# Altium PCB ELF 2 & ELF 2_Lite V1.3.PcbDoc (part 6 of 8)
Units mm, origin at the board's own origin, x right, y up, seen from the top; angles counter-clockwise.
Board outline 120 x 75 mm, 4 copper layers (01 TOP, 02 GND, 03 Signal, 04 BOT), stack 0.603 mm thick; 470 components, 412 nets, 2075 pads, 1565 vias.
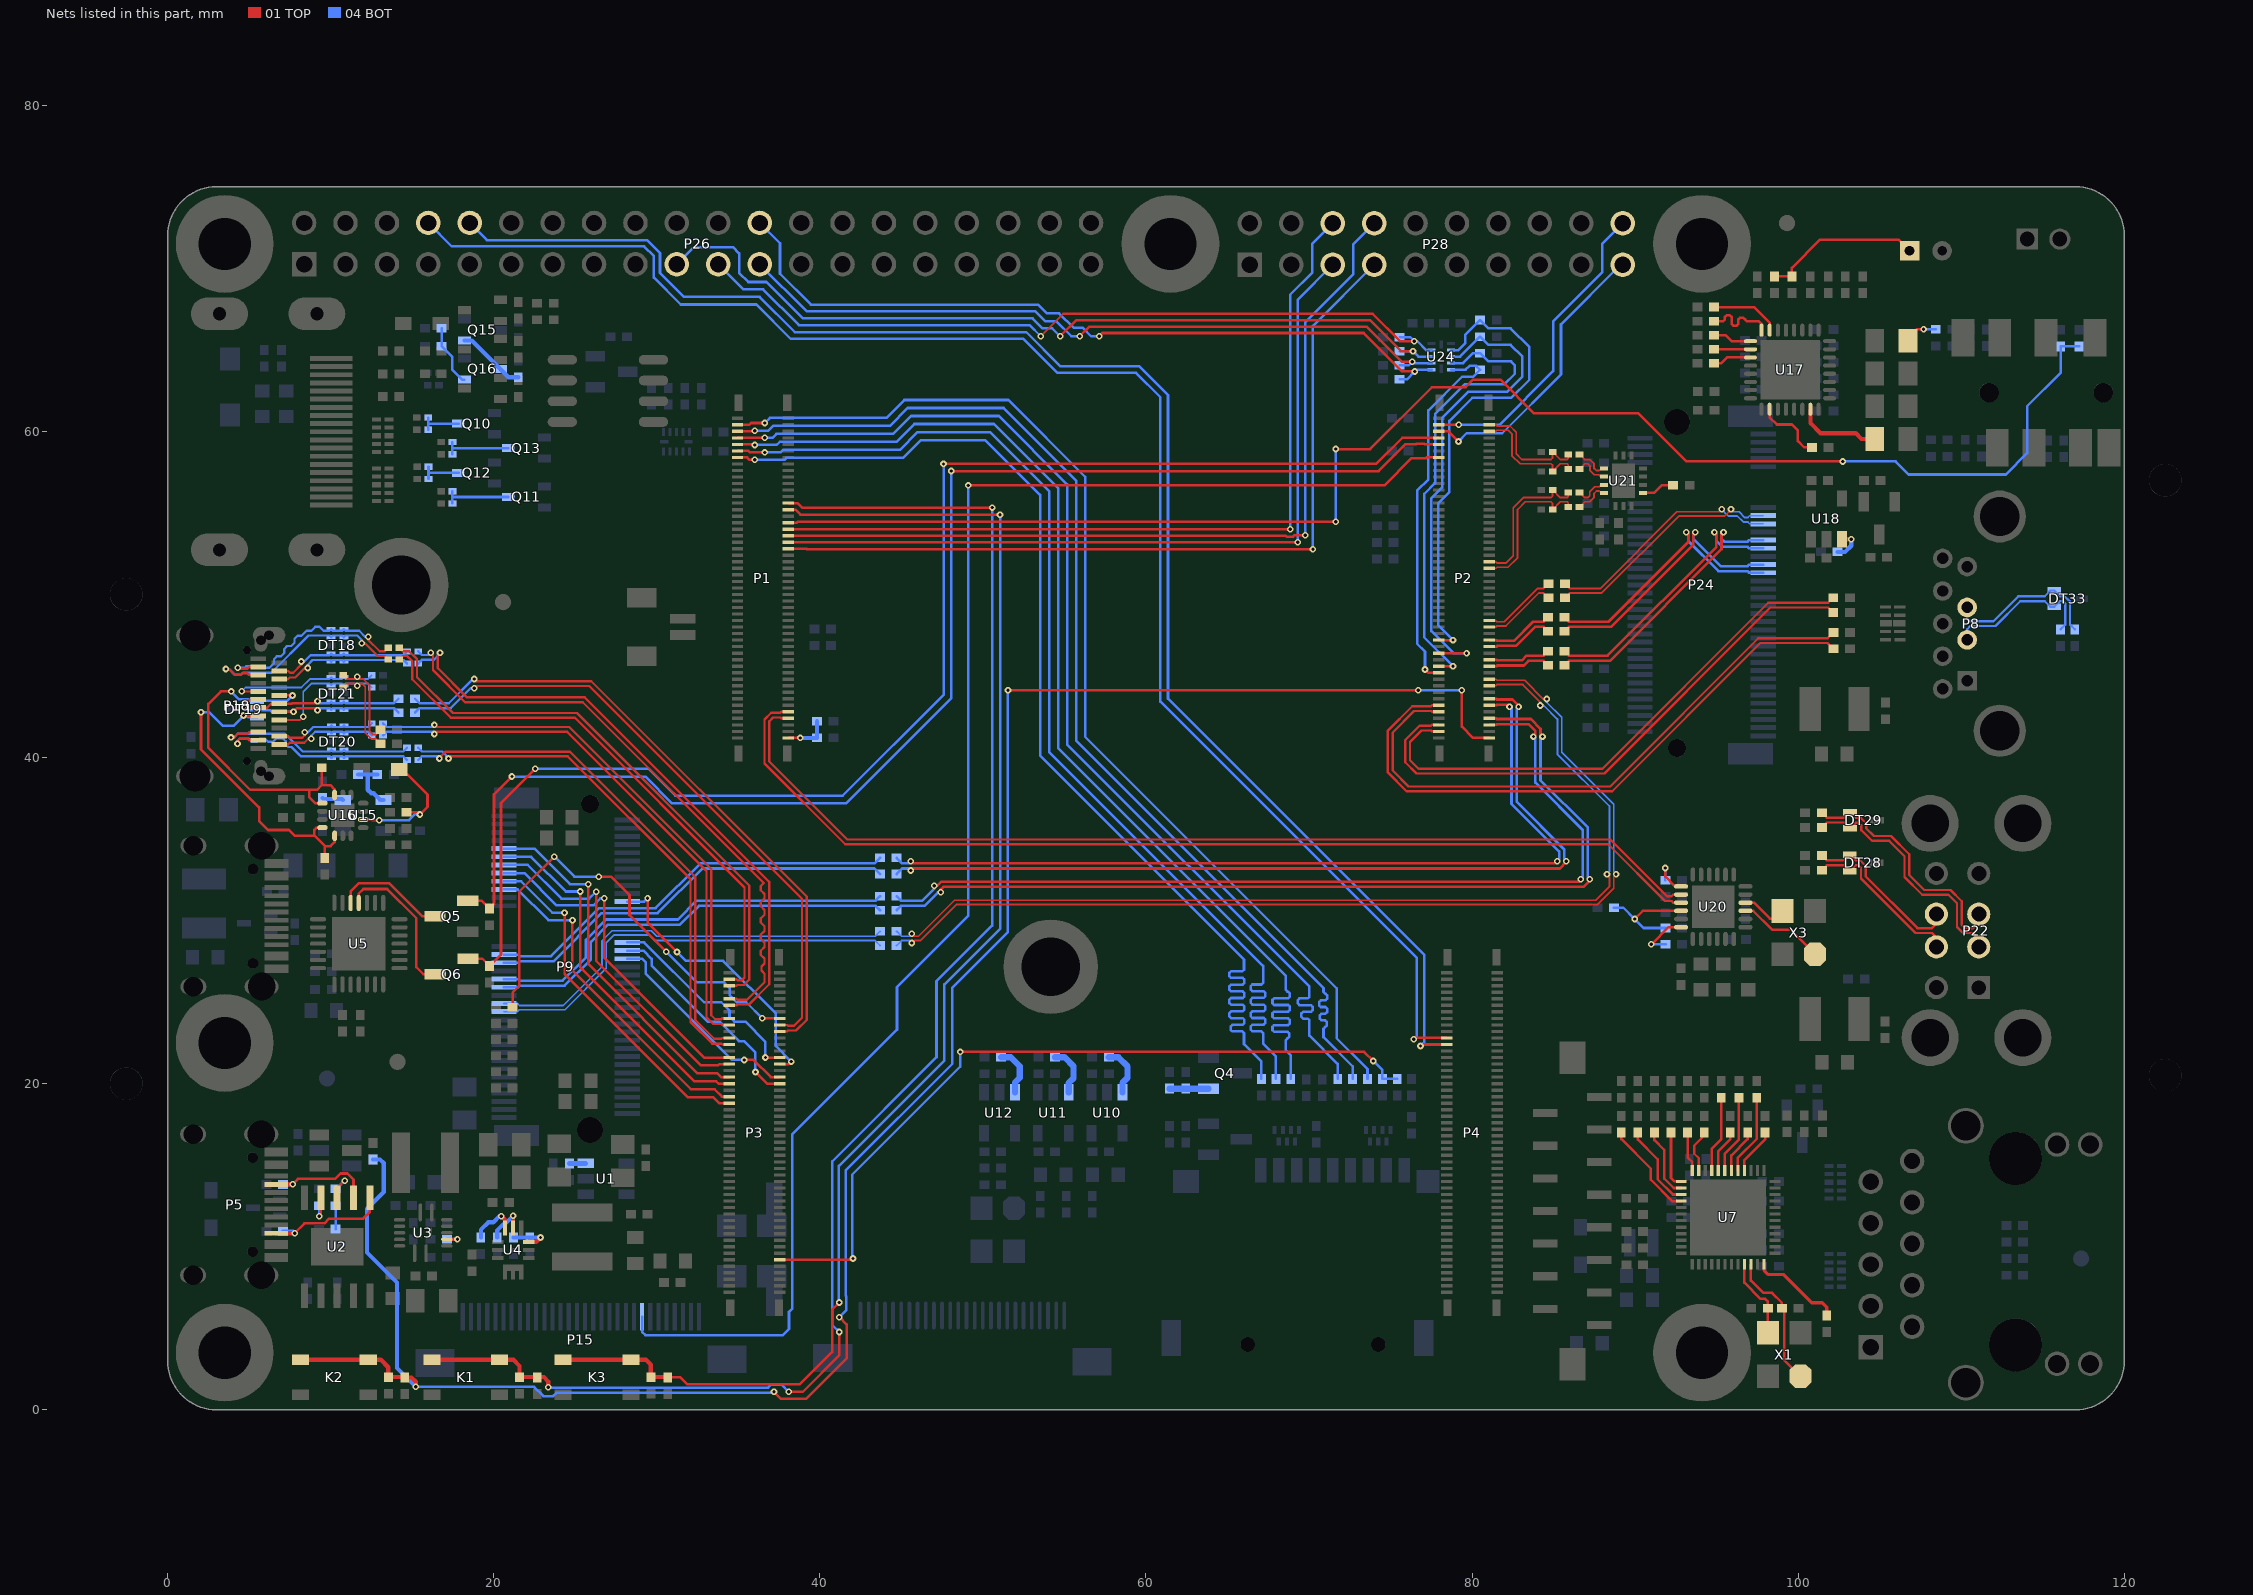
[diagram p7: the nets of this part, all layers, seen from the top]

## Via types
v1: diameter 0.406, hole 0.203, 01 TOP to 04 BOT, tented both sides, 1349 vias
v2: diameter 0.508, hole 0.305, 01 TOP to 04 BOT, tented both sides, 173 vias
v3: diameter 0.6, hole 0.3, 01 TOP to 04 BOT, tented both sides, 34 vias
v4: diameter 0.6, hole 0.3, 01 TOP to 04 BOT, 9 vias

## Nets (pads, with @x,y where several pads share a name; then routed paths per layer and width w, separated by ;. In a path a pad name is that pad's centre, name@x,y a point inside that pad or via, vN(x,y) a via of type N, cw(c..) or ccw(c..) an arc to the next point about the centre after c; other vN are vias at no path point) (continued)
NetQ4_1: Q4.1 R36.2 R37.2 | length 2.4
  04 BOT w0.381: R36.2@61.441,19.692 R37.2@62.441,19.692 63.833,19.692 Q4.1@63.841,19.684
NetQ10_3: Q10.3 R86.2 R87.2 | length 2.6
  04 BOT w0.156: R87.2@15.974,60.096 15.974,60.471 ; R86.2@15.974,60.846 15.974,60.471 ; Q10.3@17.851,60.476 15.979,60.476 15.974,60.471
NetQ11_3: Q11.3 R88.2 R89.2 | length 4.2
  04 BOT w0.156: R89.2@17.469,55.583 17.469,55.958 ; R88.2@17.469,56.333 17.469,55.958 ; Q11.3@20.901,55.976 17.487,55.976 17.469,55.958
NetQ12_3: Q12.3 R90.2 R91.2 | length 2.6
  04 BOT w0.156: R91.2@15.999,57.083 15.999,57.458 ; R90.2@15.999,57.833 15.999,57.458 ; Q12.3@17.851,57.451 16.006,57.451 15.999,57.458
NetQ13_3: Q13.3 R92.2 R93.2 | length 4.2
  04 BOT w0.156: R93.2@17.469,58.596 17.469,58.971 ; R92.2@17.469,59.346 17.469,58.971 ; Q13.3@20.901,58.976 17.474,58.976 17.469,58.971
NetQ15_1: Q15.1 Q16.3 R97.2 | length 4.2
  04 BOT w0.254: Q15.1@18.201,65.576 18.651,65.576 Q16.3@20.401,63.826 20.909,63.318 R97.2@21.501,63.318
NetQ16_1: Q16.1 R98.1 R99.1 | length 3.8
  04 BOT w0.156: R99.1@16.809,66.326 R98.1@16.809,65.226 17.452,64.583 17.452,63.782 18.058,63.176 Q16.1@18.201,63.176
NetR15_2: R15.2 U1.3 | length 1
  04 BOT w0.305: R15.2@24.657,15.112 U1.3@25.641,15.112
NetR17_1: R17.1 U2.9 | length 1.8
  01 TOP w0.156: v1(9.291,11.871) 9.4,11.979 U2.9@9.4,13
  04 BOT w0.156: v1(9.291,11.871) R17.1@9.291,12.506
NetR17_2: R17.2 R18.1 | length 1.4
  04 BOT w0.156: R18.1@10.307,11.083 R17.2@10.307,12.506
NetR19_1: R19.1 U2.8 | length 2
  01 TOP w0.156: U2.8@10.4,13 10.4,13.594 v1(10.856,14.05)
  04 BOT w0.156: R19.1@10.307,13.547 10.353,13.547 v1(10.856,14.05)
NetR26_1: R26.1 U3.4 | length 1.3
  01 TOP w0.198: U3.4@17.125,10.45 v1(17.773,10.45)
  04 BOT w0.198: R26.1@17.14,10.448 v1@17.771,10.448
NetR29_2: R29.2 R32.1 U4.3 | length 2.5
  01 TOP w0.254: U4.3@22.135,10.3 22.605,10.3 v1(22.868,10.563)
  04 BOT w0.254: R32.1@21.212,10.563 R29.2@22.212,10.563 v1(22.868,10.563)
NetR30_2: R30.2 U4.5 | length 2.5
  01 TOP w0.254: U4.5@21.185,11.15 v1(21.185,11.889)
  04 BOT w0.254: R30.2@20.212,10.563 20.212,10.997 20.573,11.358 20.654,11.358 v1(21.185,11.889)
NetR31_2: R31.2 U4.6 | length 2.9
  01 TOP w0.254: v1(20.467,11.871) 20.685,11.653 U4.6@20.685,11.15
  04 BOT w0.254: R31.2@19.212,10.563 19.212,11.043 19.665,11.495 19.971,11.495 20.347,11.871 v1(20.467,11.871)
NetR49_2: R49.2 U7.16 | length 2.8
  01 TOP w0.156: U7.16@96.7,14.675 96.7,15.313 97.963,16.575 R49.2@97.963,17.001
NetR50_2: R50.2 U7.17 | length 4.9
  01 TOP w0.156: U7.17@96.3,14.675 96.3,15.463 97.455,16.618 R50.2@97.455,19.135
NetR51_2: R51.2 U7.18 | length 2.7
  01 TOP w0.156: U7.18@95.9,14.675 95.9,15.603 96.896,16.599 R51.2@96.896,17.001
NetR53_2: R53.2 U7.19 | length 4.8
  01 TOP w0.156: U7.19@95.5,14.675 95.5,15.709 96.362,16.572 R53.2@96.362,19.135
NetR55_2: R55.2 U7.20 | length 2.6
  01 TOP w0.156: U7.20@95.1,14.675 95.1,15.858 95.821,16.579 R55.2@95.821,17.001
NetR57_2: R57.2 U7.21 | length 4.7
  01 TOP w0.156: U7.21@94.7,14.675 94.7,16.012 95.27,16.582 R57.2@95.27,19.135
NetR58_2: R58.2 U7.23 | length 2.7
  01 TOP w0.156: U7.23@93.9,14.675 93.9,15.423 93.623,15.701 93.623,16.198 94.229,16.805 R58.2@94.229,17.001
NetR59_2: R59.2 U7.24 | length 2.4
  01 TOP w0.156: R59.2@93.213,17.001 93.213,15.483 93.5,15.195 U7.24@93.5,14.675
NetR60_2: R60.2 U7.25 | length 3.5
  01 TOP w0.156: R60.2@92.197,17.001 92.197,14.218 92.415,14 U7.25@92.824,14
NetR61_2: R61.2 U7.26 | length 4.4
  01 TOP w0.156: R61.2@91.181,17.001 91.181,16.544 91.783,15.942 91.783,14.183 92.366,13.6 U7.26@92.824,13.6
NetR63_2: R63.2 U7.27 | length 5.2
  01 TOP w0.156: R63.2@90.165,17.001 90.165,16.57 91.385,15.35 91.385,14.131 92.316,13.2 U7.27@92.824,13.2
NetR64_2: R64.2 U7.28 | length 6
  01 TOP w0.156: R64.2@89.149,17.001 89.149,16.595 90.965,14.779 90.965,14.106 92.271,12.8 U7.28@92.824,12.8
NetR73_2: R73.2 U7.48 | length 5.7
  01 TOP w0.203: U7.48@97.9,8.925 97.9,8.536 98.139,8.297 99.077,8.297 100.816,6.558 101.472,6.558 101.747,6.283 R73.2@101.747,5.775
NetR78_2: R78.2 U10.3 | length 3.1
  04 BOT w0.381: R78.2@57.717,21.613 58.31,21.613 58.865,21.059 58.865,20.352 58.559,20.047 U10.3@58.559,19.463
NetR79_2: R79.2 U11.3 | length 3.1
  04 BOT w0.381: R79.2@54.417,21.613 55.01,21.613 55.553,21.071 55.553,20.336 55.259,20.042 U11.3@55.259,19.463
NetR80_2: R80.2 U12.3 | length 3.1
  04 BOT w0.381: R80.2@51.117,21.613 51.71,21.613 52.253,21.071 52.253,20.36 51.959,20.066 U12.3@51.959,19.463
NetR101_2: R101.2 R103.2 U15.4 | length 3.3
  04 BOT w0.254: R101.2@11.689,38.963 12.273,38.963 ; R103.2@12.861,38.959 R103.2@12.857,38.963 12.273,38.963 ; U15.4@13.244,37.4 13.044,37.4 12.638,37.805 12.491,37.805 12.273,38.023 12.273,38.963
NetR102_1: R102.1 U15.3 | length 1.3
  04 BOT w0.254: R102.1@9.494,37.517 9.553,37.458 10.686,37.458 U15.3@10.744,37.4
NetR116_2: R116.2 U17.11 | length 2.4
  01 TOP w0.156: R116.2@94.838,64.169 95.273,64.169 95.637,64.532 U17.11@97.072,64.532
NetR117_2: R117.2 U17.8 | length 4.6
  01 TOP w0.156: R117.2@94.838,66.76 95.321,66.76 95.399,66.76 95.502,66.863 95.502,67.013 95.604,67.116 95.81,67.116 95.912,67.013 95.912,66.585 96.015,66.482 96.22,66.482 96.323,66.585 96.323,66.863 96.425,66.965 96.631,66.965 96.733,66.863 96.836,66.76 97.384,66.76 97.574,66.76 97.747,66.588 U17.8@97.747,66.207
NetR118_2: R118.2 U17.7 | length 4.3
  01 TOP w0.156: R118.2@94.838,67.624 97.292,67.624 98.247,66.669 U17.7@98.247,66.207
NetR119_2: R119.2 U17.10 | length 2.2
  01 TOP w0.156: R119.2@94.838,65.033 U17.10@97.072,65.032
NetR120_2: R120.2 U17.9 | length 2.4
  01 TOP w0.156: R120.2@94.838,65.896 95.194,65.896 95.55,65.896 95.914,65.532 U17.9@97.072,65.532
NetR121_2: R121.2 U17.18 | length 4.2
  01 TOP w0.156: U17.18@98.247,61.357 98.247,60.864 98.688,60.423 99.614,60.423 99.982,60.054 99.982,59.397 100.366,59.013 R121.2@100.833,59.013
NetR125_2: R125.2 U18.3 | length 2
  01 TOP w0.254: U18.3@102.68,53.38 U18.3@102.678,53.382 v1(103.25,53.382)
  04 BOT w0.254: R125.2@102.4,52.609 102.874,52.609 103.25,52.984 v1(103.25,53.382)
NetR140_2: R140.2 U20.18 | length 3.1
  01 TOP w0.156: v1(90.992,28.544) 92.042,29.594 U20.18@92.813,29.594
  04 BOT w0.156: v1(90.992,28.544) R140.2@91.868,28.544
NetR142_2: R142.2 R157.1 U20.16 | length 6.7
  01 TOP w0.156: v1(89.967,30.099) 90.462,30.594 U20.16@92.813,30.594
  04 BOT w0.156: R157.1@88.697,30.785 89.281,30.785 v1(89.967,30.099) 90.521,29.544 R142.2@91.868,29.544
NetR145_1: R145.1 U20.13 | length 2.5
  01 TOP w0.156: v1(91.848,33.224) 91.848,32.699 92.452,32.094 U20.13@92.813,32.094
  04 BOT w0.156: R145.1@91.848,32.476 v1(91.848,33.224)
NetR167_2: R167.2 U21.1 | length 2
  01 TOP w0.156: U21.1@90.481,56.222 91.147,56.222 91.618,56.693 R167.2@92.329,56.693
NetU20_3: U20.3 X3.1 | length 5.4
  01 TOP w0.156: U20.3@96.763,30.594 97.24,30.594 98.395,29.44 99.52,29.44 X3.1@101.023,27.937
NetU20_4: U20.4 X3.3 | length 2.9
  01 TOP w0.156: U20.4@96.763,31.094 97.277,31.094 98.257,30.115 98.551,30.115 X3.3@99.023,30.587
PCIE0_REFCLK_N: P2.64 R154.2 | length 4.6
  01 TOP w0.109: P2.64@81.05,48.4 81.446,48.4 81.515,48.331 81.967,48.331 83.992,50.355 84.377,50.355 R154.2@84.678,50.656
PCIE0_REFCLK_P: P2.66 R153.2 | length 4.6
  01 TOP w0.109: P2.66@81.05,48 81.446,48 81.515,48.069 82.076,48.069 84.1,50.094 84.377,50.094 R153.2@84.678,49.793
PCIE0_RX_N: P2.70 R160.2 | length 4.2
  01 TOP w0.163: P2.70@81.05,47.2 81.497,47.2 81.539,47.157 82.563,47.157 83.73,48.325 84.379,48.325 R160.2@84.653,48.599
PCIE0_RX_P: P2.72 R159.2 | length 4.2
  01 TOP w0.163: P2.72@81.05,46.8 81.497,46.8 81.539,46.843 82.693,46.843 83.861,48.01 84.379,48.01 R159.2@84.653,47.735
PCIE0_TX_N: P2.76 R158.2 | length 3.9
  01 TOP w0.163: P2.76@81.05,46 81.497,46 81.539,45.957 81.632,45.957 83.045,45.957 83.33,46.242 84.379,46.242 R158.2@84.653,46.516
PCIE0_TX_P: P2.78 R156.2 | length 3.9
  01 TOP w0.163: P2.78@81.05,45.6 81.497,45.6 81.539,45.643 83.176,45.643 83.46,45.927 84.379,45.927 R156.2@84.653,45.653
PCIE2_CLK_N: P9.49 R161.1 | length 26.2
  04 BOT w0.109: P9.49@20.629,24.411 21.454,24.411 21.573,24.531 24.367,24.531 26.902,27.066 26.902,28.648 27.363,29.108 29.543,29.108 29.877,28.774 43.387,28.774 R161.1@43.688,28.473
PCIE2_CLK_P: P9.47 R162.1 | length 26.2
  04 BOT w0.109: P9.47@20.629,24.911 21.46,24.911 21.579,24.792 24.259,24.792 26.641,27.174 26.641,28.756 27.254,29.37 29.652,29.37 29.986,29.036 43.387,29.036 R162.1@43.688,29.337
PCIE2_RX_N: P9.43 R163.1 | length 25.9
  04 BOT w0.163: P9.43@20.629,25.911 21.489,25.911 21.582,26.004 24.351,26.004 25.958,27.611 25.958,28.692 27.015,29.749 31.416,29.749 32.573,30.907 43.414,30.907 R163.1@43.688,30.632
PCIE2_RX_P: P9.41 R164.1 | length 25.9
  04 BOT w0.163: P9.41@20.629,26.411 21.484,26.411 21.576,26.319 24.22,26.319 25.643,27.742 25.643,28.822 26.885,30.064 31.285,30.064 32.443,31.222 43.414,31.222 R164.1@43.688,31.496
PCIE2_TX_N: C134.1 P9.37 | length 25.6
  04 BOT w0.163: P9.37@20.629,27.411 21.489,27.411 21.582,27.504 23.653,27.504 26.599,30.45 30.054,30.45 32.797,33.193 43.35,33.193 C134.1@43.688,32.855
PCIE2_TX_P: C140.1 P9.35 | length 25.6
  04 BOT w0.163: P9.35@20.629,27.911 21.484,27.911 21.576,27.819 23.522,27.819 26.468,30.765 29.924,30.765 32.666,33.508 43.35,33.508 C140.1@43.688,33.845
PCIE20_0_REFCLK_N: P2.82 R161.2 | length 63
  01 TOP w0.109: v1(45.644,28.626) 45.792,28.774 46.159,28.774 48.365,30.98 87.685,30.98 88.679,31.974 88.679,32.694 v1(88.828,32.842) ; P2.82@81.05,44.8 81.461,44.8 81.53,44.731 83.223,44.731 84.37,43.584 v1(84.58,43.584)
  04 BOT w0.109: R161.2@44.704,28.473 45.005,28.774 45.495,28.774 v1(45.644,28.626) ; v1(84.58,43.584) 84.58,43.374 85.491,42.463 85.491,40.319 88.679,37.131 88.679,32.991 v1(88.828,32.842)
PCIE20_0_REFCLK_P: P2.84 R162.2 | length 62.1
  01 TOP w0.109: v1(45.644,29.185) 45.792,29.036 46.05,29.036 48.256,31.242 87.577,31.242 88.417,32.083 88.417,32.694 v1(88.269,32.842) ; P2.84@81.05,44.4 81.447,44.4 81.516,44.469 83.115,44.469 84.185,43.399 v1(84.185,43.189)
  04 BOT w0.109: R162.2@44.704,29.337 45.005,29.036 45.495,29.036 v1(45.644,29.185) ; v1(84.185,43.189) 84.395,43.189 85.23,42.354 85.23,40.211 88.417,37.023 88.417,32.991 v1(88.269,32.842)
PCIE20_0_RX_N: P2.94 R163.2 | length 57.4
  01 TOP w0.163: v1(47.411,31.731) 47.411,31.903 47.576,32.068 86.824,32.068 87.221,32.465 v1(87.221,32.524) ; P2.94@81.05,42.4 81.473,42.4 81.515,42.357 83.597,42.357 84.196,41.759 84.196,41.406 v1(84.318,41.284)
  04 BOT w0.163: R163.2@44.704,30.632 44.978,30.907 45.817,30.907 46.414,30.907 47.238,31.731 v1(47.411,31.731) ; v1(84.318,41.284) 84.196,41.162 84.196,38.598 87.099,35.695 87.099,32.646 v1(87.221,32.524)
PCIE20_0_RX_P: P2.96 R164.2 | length 56.2
  01 TOP w0.163: v1(47.016,32.126) 47.188,32.126 47.445,32.383 86.521,32.383 v1(86.662,32.524) ; P2.96@81.05,42 81.481,42 81.524,42.043 83.466,42.043 83.881,41.628 83.881,41.406 v1(83.759,41.284)
  04 BOT w0.163: R164.2@44.704,31.496 44.978,31.222 45.817,31.222 46.284,31.222 47.016,31.954 v1(47.016,32.126) ; v1(83.759,41.284) 83.881,41.162 83.881,38.468 86.784,35.565 86.784,32.646 v1(86.662,32.524)
PCIE20_0_TX_N: C134.2 P2.88 | length 54.4
  01 TOP w0.163: v1(45.568,33.071) 45.69,33.193 85.387,33.193 85.771,33.577 v1(85.771,33.636) ; P2.88@81.05,43.6 81.473,43.6 81.515,43.557 82.467,43.557 82.849,43.175 v1(82.849,43.116)
  04 BOT w0.163: C134.2@44.704,32.855 45.042,33.193 45.446,33.193 v1(45.568,33.071) ; v1(82.849,43.116) 82.728,42.994 82.728,37.287 85.649,34.365 85.649,33.758 v1(85.771,33.636)
PCIE20_0_TX_P: C140.2 P2.90 | length 52.9
  01 TOP w0.163: v1(45.568,33.63) 45.69,33.508 85.084,33.508 v1(85.213,33.636) ; P2.90@81.05,43.2 81.481,43.2 81.524,43.243 82.164,43.243 v1(82.291,43.116)
  04 BOT w0.163: C140.2@44.704,33.845 45.042,33.508 45.446,33.508 v1(45.568,33.63) ; v1(82.291,43.116) 82.413,42.994 82.413,37.157 85.334,34.235 85.334,33.758 v1(85.213,33.636)
PCIE30_PORT0_REFCLK_IN_N: P2.46 R166.1 R169.2 | length 9.1
  01 TOP w0.109: P2.46@81.05,52 81.45,52 81.52,51.931 82.093,51.931 82.525,52.363 82.525,55.32 83.144,55.939 84.836,55.939 84.934,56.038 R166.1@84.934,56.405 85.4,55.939 85.827,55.939 85.9,56.012 R169.2@85.9,56.253
PCIE30_PORT0_REFCLK_IN_P: P2.48 R165.1 R168.2 | length 9.1
  01 TOP w0.109: P2.48@81.05,51.6 81.461,51.6 81.53,51.669 82.201,51.669 82.786,52.254 82.786,55.212 83.252,55.677 84.836,55.677 84.934,55.579 R165.1@84.934,55.211 85.4,55.677 85.827,55.677 85.9,55.604 R168.2@85.9,55.364
PCIE30_PORT1_REFCLK_IN_N: P2.6 R170.2 R173.1 | length 7.4
  01 TOP w0.109: P2.6@81.05,60 81.444,60 81.513,60.069 82.214,60.069 82.438,59.845 82.438,58.514 82.941,58.011 84.836,58.011 84.934,57.913 R173.1@84.934,57.545 85.4,58.011 85.827,58.011 85.9,57.938 R170.2@85.9,57.698
PCIE30_PORT1_REFCLK_IN_P: P2.4 R171.2 R172.1 | length 7.4
  01 TOP w0.109: P2.4@81.05,60.4 81.45,60.4 81.519,60.331 82.322,60.331 82.7,59.953 82.7,58.622 83.049,58.273 84.836,58.273 84.934,58.371 R172.1@84.934,58.739 85.4,58.273 85.827,58.273 85.9,58.346 R171.2@85.9,58.587
PCIE_CLK0_N: R169.1 U21.10 | length 2.1
  01 TOP w0.109: R169.1@86.585,56.253 86.899,55.939 87.098,55.939 87.219,56.06 87.219,56.301 87.521,56.603 87.787,56.603 87.906,56.722 U21.10@88.081,56.722
PCIE_CLK0_P: R168.1 U21.11 | length 2.1
  01 TOP w0.109: R168.1@86.585,55.364 86.899,55.677 87.206,55.677 87.481,55.952 87.481,56.193 87.629,56.341 87.79,56.341 87.909,56.222 U21.11@88.081,56.222
PCIE_CLK1_N: R170.1 U21.9 | length 2.1
  01 TOP w0.109: R170.1@86.585,57.698 86.899,58.011 87.103,58.011 87.22,57.894 87.22,57.621 87.5,57.341 87.772,57.341 87.891,57.222 U21.9@88.081,57.222
PCIE_CLK1_P: R171.1 U21.8 | length 2.1
  01 TOP w0.109: R171.1@86.585,58.587 86.899,58.273 87.211,58.273 87.482,58.002 87.482,57.73 87.608,57.603 87.783,57.603 87.902,57.722 U21.8@88.081,57.722
PD_CC1: DT3.1 P5.A5 U2.7 | length 6.9
  01 TOP w0.156: v1(7.666,13.826) 7.996,14.157 10.275,14.157 10.607,14.489 11.031,14.489 11.4,14.12 U2.7@11.4,13
  01 TOP w0.254: P5.A5@6.658,13.825 v1(7.666,13.826) v1(7.666,13.826)
  04 BOT w0.254: DT3.1@7.081,13.826 v1(7.666,13.826)
PD_CC2: DT35.1 P5.B5 U2.6 | length 7.9
  01 TOP w0.156: v1(7.788,10.825) 8.39,11.427 9.61,11.427 9.901,11.718 11.984,11.718 12.4,12.135 U2.6@12.4,13
  01 TOP w0.254: P5.B5@6.658,10.825 v1(7.788,10.825)
  04 BOT w0.254: DT35.1@7.081,10.929 7.685,10.929 v1(7.788,10.825)
PHY0_XTALIN: C48.2 U7.45 X1.3 | length 5
  01 TOP w0.156: U7.45@96.7,8.925 96.7,7.794 97.692,6.802 97.964,6.802 98.134,6.632 C48.2@98.134,6.225 98.134,4.715 X1.3@98.131,4.712
PHY0_XTALOUT: C49.2 U7.46 X1.1 | length 8.4
  01 TOP w0.156: U7.46@97.1,8.925 97.1,7.921 97.856,7.165 98.394,7.165 98.998,6.562 C49.2@98.998,6.225 99.131,6.091 99.131,3.062 X1.1@100.131,2.062
PWM0--PWM2: P2.3 P28.20 | length 19.2
  01 TOP w0.156: P2.3@77.95,60.4 v1(79.171,60.4)
  04 BOT w0.156: v1(79.171,60.4) 81.665,60.4 84.961,63.696 84.961,66.745 87.986,69.769 87.986,71.513 P28.20@89.23,72.757
PWM0--PWM5: P2.13 P15.8 | length 96
  01 TOP w0.156: v1(49.109,56.686) 74.622,56.686 76.29,58.354 77.171,58.354 77.217,58.4 P2.13@77.95,58.4
  04 BOT w0.156: P15.8@29.1,5.7 29.1,4.777 29.298,4.578 37.729,4.578 38.107,4.957 38.107,6 38.314,6.207 38.314,16.897 44.728,23.312 44.728,25.917 49.109,30.298 v1(49.109,56.686)
PWM1--PWM4: P2.5 P28.19 | length 17.8
  01 TOP w0.156: P2.5@77.95,60 78.544,60 v1(79.164,59.381)
  04 BOT w0.156: v1(79.164,59.381) 79.667,59.884 81.846,59.884 85.451,63.489 85.451,66.566 89.102,70.217 P28.19@89.23,70.217
RESET_L: C17.2 DT5.1 K2.1 K2.2 P2.100 R27.1 | length 129.9
  01 TOP w0.156: v1(37.186,1.102) 37.624,0.664 39.151,0.664 41.635,3.149 41.635,5.233 v1(41.193,5.675) ; v1(51.534,44.129) v1(76.703,44.129) ; v1(79.37,44.129) 79.37,41.893 80.063,41.2 P2.100@81.05,41.2
  01 TOP w0.254: K2.1@8.158,3.065 K2.2@12.308,3.065 13.074,3.065 13.533,2.606 DT5.1@13.533,1.998 14.522,1.998 C17.2@14.54,1.98 14.959,1.98 15.222,1.717 v1(15.222,1.407)
  04 BOT w0.156: v1(15.222,1.407) 22.482,1.407 23.052,0.837 23.644,0.837 23.84,1.034 37.117,1.034 v1(37.186,1.102) ; v1(41.193,5.675) 41.627,6.109 41.627,6.96 41.575,7.012 41.575,14.672 48.123,21.22 48.123,25.882 51.534,29.293 v1(51.534,44.129) ; v1(76.703,44.129) v1(79.37,44.129)
  04 BOT w0.254: R27.1@12.593,15.35 13.025,15.35 13.254,15.122 13.254,13.344 12.238,12.328 12.238,9.635 14.066,7.807 14.066,2.563 v1(15.222,1.407)
RHP: C107.2 R129.1 | length 2.1
  01 TOP w0.156: C107.2@106.726,65.554 106.726,65.721 107.263,66.258 v1(107.686,66.258)
  04 BOT w0.156: v1(107.686,66.258) R129.1@108.432,66.258
RMIC_P: C109.1 P20.1 R122.1 | length 9.8
  01 TOP w0.156: R122.1@98.546,69.504 C109.1@99.613,69.504 ; C109.1@99.613,69.501 C109.1@99.613,69.504 ; P20.1@106.826,71.074 106.145,71.755 101.346,71.755 99.613,70.022 C109.1@99.613,69.504
RSPKOUT: C111.1 U17.23 | length 5.2
  01 TOP w0.254: U17.23@100.747,61.357 100.747,60.502 101.364,59.885 103.529,59.885 103.881,59.534 C111.1@104.694,59.534
S_PCIE_CLK_N: P24.53 R154.1 | length 14.7
  01 TOP w0.109: R154.1@85.694,50.656 85.995,50.355 87.845,50.355 92.557,55.068 95.161,55.068 v1(95.314,55.22)
  04 BOT w0.109: v1(95.314,55.22) 95.462,55.072 95.462,55.051 95.703,54.81 95.724,54.81 95.725,54.809 96.262,54.809 96.622,54.449 96.89,54.449 97.01,54.33 P24.53@97.85,54.33
S_PCIE_CLK_P: P24.55 R153.1 | length 14.7
  01 TOP w0.109: R153.1@85.694,49.793 85.995,50.094 87.954,50.094 92.666,54.806 95.479,54.806 95.724,55.051 95.724,55.072 v1(95.872,55.22)
  04 BOT w0.109: v1(95.872,55.22) 96.022,55.071 96.37,55.071 96.731,54.711 96.89,54.711 97.01,54.83 P24.55@97.85,54.83
S_PCIE_RX_N: P24.41 R160.1 | length 16.4
  01 TOP w0.163: R160.1@85.669,48.599 85.943,48.325 88.375,48.325 93.253,53.203 93.253,53.697 v1(93.132,53.819)
  04 BOT w0.163: v1(93.132,53.819) 93.253,53.697 93.253,53.276 95.107,51.423 96.902,51.423 96.994,51.33 P24.41@97.85,51.33
S_PCIE_RX_P: P24.43 R159.1 | length 16.4
  01 TOP w0.163: R159.1@85.669,47.735 85.943,48.01 88.505,48.01 93.568,53.073 93.568,53.697 v1(93.69,53.819)
  04 BOT w0.163: v1(93.69,53.819) 93.568,53.697 93.568,53.406 95.237,51.737 96.902,51.737 96.994,51.83 P24.43@97.85,51.83
S_PCIE_TX_N: P24.47 R158.1 | length 16.8
  01 TOP w0.163: R158.1@85.669,46.516 85.943,46.242 88.311,46.242 94.981,52.911 94.981,53.697 v1(94.859,53.819)
  04 BOT w0.163: v1(94.859,53.819) 94.981,53.697 94.981,53.282 95.34,52.923 96.902,52.923 96.994,52.83 P24.47@97.85,52.83
S_PCIE_TX_P: P24.49 R156.1 | length 16.8
  01 TOP w0.163: R156.1@85.669,45.653 85.943,45.927 88.442,45.927 95.296,52.781 95.296,53.697 v1(95.418,53.819)
  04 BOT w0.163: v1(95.418,53.819) 95.296,53.697 95.296,53.413 95.471,53.237 96.902,53.237 96.994,53.33 P24.49@97.85,53.33
SARADC_VIN0_BOOT: C12.2 DT4.1 K1.1 K1.2 P1.28 | length 96.3
  01 TOP w0.156: P1.28@38.05,55.6 38.638,55.6 38.912,55.326 v1(50.564,55.326) ; v1(38.09,1.102) 38.949,1.102 41.193,3.346 v1(41.193,4.771)
  01 TOP w0.254: K1.1@16.208,3.065 K1.2@20.358,3.065 21.202,3.065 21.583,2.684 DT4.1@21.583,1.998 22.65,1.998 C12.2@22.668,1.98 22.686,1.998 23.085,1.998 23.339,1.743 v1(23.339,1.384)
  04 BOT w0.156: v1(23.339,1.384) 23.361,1.362 36.832,1.362 37.006,1.536 37.656,1.536 v1(38.09,1.102) ; v1(41.193,4.771) 40.759,5.205 40.759,15.228 47.153,21.622 47.153,26.284 50.564,29.695 v1(50.564,55.326)
SARADC_VIN1_RECOVERY: C20.2 DT6.1 K3.1 K3.2 P1.30 | length 87.2
  01 TOP w0.156: C20.2@30.651,1.998 31.432,1.998 31.876,1.554 38.762,1.554 40.746,3.538 40.746,6.132 v1(41.193,6.579) ; P1.30@38.05,55.2 38.502,55.2 38.811,54.891 v1(51.049,54.891)
  01 TOP w0.254: K3.1@24.258,3.065 K3.2@28.408,3.065 29.33,3.065 29.633,2.762 DT6.1@29.633,1.998 C20.2@30.651,1.998
  04 BOT w0.156: v1(41.193,6.579) 41.167,6.605 41.167,14.95 47.638,21.421 47.638,26.083 51.049,29.494 v1(51.049,54.891)
SARADC_VIN3_HP_HOOK: P1.34 R124.1 R126.2 | length 93.7
  01 TOP w0.156: P1.34@38.05,54.4 38.579,54.4 38.635,54.457 v1(71.629,54.457) ; v1(71.629,58.917) 73.742,58.917 77.532,62.707 79.598,62.707 80.061,63.17 81.733,63.17 83.795,61.109 90.193,61.109 93.146,58.155 v1(102.736,58.155)
  04 BOT w0.156: v1(71.629,54.457) v1(71.629,58.917) ; v1(102.736,58.155) 105.968,58.155 106.766,57.356 112.733,57.356 114.041,58.664 114.041,61.541 116.102,63.602 R126.2@116.102,65.217 R124.1@117.22,65.217
SARADC_VIN4: P1.36 P28.6 | length 50.6
  01 TOP w0.156: P1.36@38.05,54 v1(68.845,54) v1@68.855,54
  04 BOT w0.156: v1(68.845,54) 68.845,68.388 70.206,69.748 70.206,71.513 P28.6@71.45,72.757
SARADC_VIN5: P1.38 P28.8 | length 52.7
  01 TOP w0.156: P1.38@38.05,53.6 68.571,53.6 68.624,53.546 69.018,53.546 69.105,53.634 v1(69.773,53.634)
  04 BOT w0.156: v1(69.773,53.634) 69.773,66.694 72.72,69.641 72.72,71.487 P28.8@73.99,72.757
SARADC_VIN6: P1.40 P28.5 | length 49.2
  01 TOP w0.156: P1.40@38.05,53.2 v1(69.309,53.2)
  04 BOT w0.156: v1(69.309,53.2) 69.309,68.076 P28.5@71.45,70.217
SARADC_VIN7: P1.42 P28.7 | length 51.2
  01 TOP w0.156: P1.42@38.05,52.8 39.179,52.8 39.213,52.766 v1(70.237,52.766)
  04 BOT w0.156: v1(70.237,52.766) 70.237,66.464 P28.7@73.99,70.217
SDMMC0_CLK: P1.7 R42.1 | length 68.1
  01 TOP w0.156: P1.7@34.95,59.6 v1(36.619,59.6)
  04 BOT w0.156: v1(36.619,59.6) 37.087,59.6 37.337,59.849 44.496,59.849 45.589,60.942 50.973,60.942 55.166,56.749 55.166,40.8 70.023,25.944 70.023,25.815 70.023,25.326 69.92,25.223 69.414,25.223 69.312,25.121 69.312,24.915 69.414,24.813 70.117,24.813 70.219,24.71 70.219,24.505 70.117,24.402 69.635,24.402 69.533,24.3 69.533,24.095 69.635,23.992 69.92,23.992 70.023,23.889 70.023,23.205 70.023,22.941 71.755,21.209 R42.1@71.755,20.295
SDMMC0_CMD: P1.9 R41.1 | length 69.8
  01 TOP w0.156: P1.9@34.95,59.2 35.975,59.2 v1(36.008,59.166)
  04 BOT w0.156: v1(36.008,59.166) 37.349,59.166 37.54,59.358 44.7,59.358 45.793,60.451 50.68,60.451 54.611,56.52 54.611,40.57 68.575,26.607 68.575,25.824 68.575,25.746 68.677,25.643 68.718,25.643 68.82,25.541 68.82,25.336 68.718,25.233 67.861,25.233 67.759,25.13 67.759,24.925 67.861,24.823 68.718,24.823 68.82,24.72 68.82,24.515 68.718,24.412 67.861,24.412 67.759,24.309 67.759,24.104 67.861,24.002 68.718,24.002 68.82,23.899 68.82,23.694 68.718,23.591 67.861,23.591 67.759,23.489 67.759,23.283 67.861,23.181 68.68,23.181 68.782,23.078 68.782,22.873 68.68,22.77 68.677,22.77 68.575,22.668 68.575,22.453 68.575,22.04 68.885,21.73 R41.1@68.885,20.295
SDMMC0_D0: P1.5 R43.1 | length 68.5
  01 TOP w0.156: P1.5@34.95,60 35.975,60 v1(36.008,60.034)
  04 BOT w0.156: v1(36.008,60.034) 36.826,60.034 37.133,60.341 44.293,60.341 45.386,61.434 51.266,61.434 55.721,56.979 55.721,41.03 70.886,25.865 70.886,25.701 70.886,25.623 70.989,25.52 71.005,25.52 71.107,25.418 71.107,25.212 71.005,25.11 70.72,25.11 70.617,25.007 70.617,24.802 70.72,24.699 71.005,24.699 71.107,24.597 71.107,24.392 71.005,24.289 70.764,24.289 70.661,24.186 70.661,23.981 70.764,23.878 70.989,23.878 71.091,23.776 71.091,23.571 70.989,23.468 70.886,23.365 70.886,22.964 70.886,22.848 72.669,21.065 R43.1@72.669,20.295
SDMMC0_D1: P1.3 R44.1 | length 68
  01 TOP w0.156: P1.3@34.95,60.4 35.668,60.4 35.781,60.513 v1(36.61,60.513)
  04 BOT w0.156: v1(36.61,60.513) 36.929,60.832 44.089,60.832 45.182,61.925 51.56,61.925 56.276,57.209 56.276,41.26 71.699,25.837 71.699,22.771 73.584,20.886 R44.1@73.584,20.295
SDMMC0_D2: P1.13 R39.1 | length 69.7
  01 TOP w0.156: P1.13@34.95,58.4 35.533,58.4 35.682,58.251 v1(36.012,58.251)
  04 BOT w0.156: v1(36.012,58.251) 37.824,58.251 37.947,58.375 45.107,58.375 46.2,59.468 50.139,59.468 53.502,56.105 53.502,40.111 66.009,27.603 66.009,27.484 66.009,26.995 65.907,26.893 65.216,26.893 65.114,26.79 65.114,26.585 65.216,26.482 65.928,26.482 66.031,26.38 66.031,26.174 65.928,26.072 65.216,26.072 65.114,25.969 65.114,25.764 65.216,25.661 65.928,25.661 66.031,25.559 66.031,25.353 65.928,25.251 65.216,25.251 65.114,25.148 65.114,24.943 65.216,24.84 65.928,24.84 66.031,24.738 66.031,24.532 65.928,24.43 65.216,24.43 65.114,24.327 65.114,24.122 65.216,24.019 65.928,24.019 66.031,23.917 66.031,23.712 65.928,23.609 65.297,23.609 65.194,23.506 65.194,23.301 65.297,23.198 65.907,23.198 66.009,23.096 66.009,22.453 66.009,22.428 67.081,21.356 R39.1@67.081,20.295
SDMMC0_D3: P1.11 R40.1 | length 68.9
  01 TOP w0.156: P1.11@34.95,58.8 35.615,58.8 35.707,58.708 v1(36.622,58.708)
  04 BOT w0.156: v1(36.622,58.708) 37.586,58.708 37.744,58.866 44.903,58.866 45.996,59.959 50.432,59.959 54.057,56.335 54.057,40.34 67.178,27.219 67.178,26.669 67.178,26.181 67.075,26.078 66.526,26.078 66.424,25.975 66.424,25.77 66.526,25.667 67.219,25.667 67.321,25.565 67.321,25.36 67.219,25.257 66.526,25.257 66.424,25.154 66.424,24.949 66.526,24.847 67.219,24.847 67.321,24.744 67.321,24.539 67.219,24.436 66.526,24.436 66.424,24.333 66.424,24.128 66.526,24.026 67.219,24.026 67.321,23.923 67.321,23.718 67.219,23.615 66.527,23.615 66.424,23.513 66.424,23.307 66.527,23.205 67.075,23.205 67.178,23.102 67.178,22.462 67.187,22.453 67.97,21.67 R40.1@67.97,20.295
SDMMC0_DET_L: P3.90 R45.2 R46.1 | length 47.8
  01 TOP w0.156: P3.90@37.55,9.2 42.003,9.2 42.029,9.226 v1(42.029,9.272) ; v1(48.608,21.944) 73.382,21.944 v1(73.939,21.387)
  04 BOT w0.156: v1(42.029,9.272) 41.982,9.319 41.982,14.412 48.608,21.038 v1(48.608,21.944) ; v1(73.939,21.387) 74.498,20.828 R46.1@74.498,20.295 R45.2@75.413,20.295
SDMMC1_CLK_M0: P3.33 P9.9 | length 22.5
  01 TOP w0.156: v1(25.799,32.236) 25.799,27.328 32.5,20.628 33.716,20.628 33.943,20.4 P3.33@34.45,20.4
  04 BOT w0.156: P9.9@20.629,34.411 22.499,34.411 24.675,32.236 v1(25.799,32.236)
SDMMC1_CMD_M0: P3.35 P9.11 | length 22.3
  01 TOP w0.156: v1(25.313,31.782) 25.313,27.127 32.299,20.142 33.645,20.142 33.787,20 P3.35@34.45,20
  04 BOT w0.156: P9.11@20.629,33.911 22.292,33.911 24.421,31.782 v1(25.313,31.782)
SDMMC1_D0_M0: P3.29 P9.13 | length 21.8
  01 TOP w0.156: v1(26.285,31.775) 26.285,27.53 32.701,21.114 33.766,21.114 33.852,21.2 P3.29@34.45,21.2
  04 BOT w0.156: P9.13@20.629,33.411 22.085,33.411 24.156,31.34 25.85,31.34 v1(26.285,31.775)
SDMMC1_D1_M0: P3.27 P9.15 | length 21
  01 TOP w0.156: v1(26.772,31.369) 26.772,27.731 32.903,21.6 P3.27@34.45,21.6
  04 BOT w0.156: P9.15@20.629,32.911 21.878,32.911 23.852,30.937 26.105,30.937 26.536,31.369 v1(26.772,31.369)
SDMMC1_D2_M0: P3.41 P9.17 | length 21.7
  01 TOP w0.156: v1(24.341,30.48) 24.341,26.724 31.896,19.169 33.453,19.169 33.822,18.8 P3.41@34.45,18.8
  04 BOT w0.156: P9.17@20.629,32.411 21.67,32.411 23.602,30.48 v1(24.341,30.48)
SDMMC1_D3_M0: P3.39 P9.19 | length 20.9
  01 TOP w0.156: v1(24.827,30.023) 24.827,26.926 32.097,19.655 33.538,19.655 33.993,19.2 P3.39@34.45,19.2
  04 BOT w0.156: P9.19@20.629,31.911 21.463,31.911 23.352,30.023 v1(24.827,30.023)
SPI1--SPI4--CLK: P2.77 R186.2 U24.4 | length 28.2
  01 TOP w0.156: P2.77@77.95,45.6 v1(78.83,45.6)
  04 BOT w0.156: U24.4@78.711,64.186 79.45,64.186 80.06,64.795 R186.2@80.493,64.795 81.001,64.287 82.384,64.287 82.619,64.053 82.619,63.533 81.979,62.893 79.567,62.893 77.73,61.056 77.73,56.827 77.064,56.161 77.064,47.366 v1(78.83,45.6)
SPI1--SPI4--CLK_3V3: P26.23 R187.1 U24.8 | length 45.1
  01 TOP w0.156: v1(55.932,65.833) 56.525,66.427 73.528,66.427 75.68,64.275 v1(76.335,64.275)
  04 BOT w0.156: P26.23@36.31,70.243 39.2,67.353 53.215,67.353 53.824,66.744 54.515,66.744 55.426,65.833 v1(55.932,65.833) ; R187.1@75.555,64.053 76.113,64.053 v1(76.335,64.275) 76.423,64.186 U24.8@77.511,64.186
SPI1--SPI4--CS: P2.79 R188.2 U24.5 | length 23.5
  01 TOP w0.156: v1(77.11,45.394) 77.304,45.2 P2.79@77.95,45.2
  04 BOT w0.156: v1(77.11,45.394) 77.11,46.499 76.632,46.976 76.632,56.364 77.32,57.052 77.32,61.286 79.393,63.359 80.072,63.359 R188.2@80.493,63.779 80.249,64.023 79.843,64.023 79.606,63.786 U24.5@78.711,63.786
SPI1--SPI4--CS_3V3: P26.24 R189.1 U24.7 | length 47.4
  01 TOP w0.156: v1(57.126,65.833) 57.326,66.033 73.342,66.033 75.701,63.675 v1(76.477,63.675)
  04 BOT w0.156: P26.24@36.31,72.783 37.555,71.538 37.555,69.665 39.447,67.774 53.389,67.774 53.922,67.242 54.671,67.242 55.571,66.341 56.127,66.341 56.636,65.833 v1(57.126,65.833) ; R189.1@75.555,63.19 75.992,63.19 v1(76.477,63.675) 76.589,63.786 U24.7@77.511,63.786
SPI1--SPI4--MISO: P2.69 R182.2 U24.2 | length 29.5
  01 TOP w0.156: P2.69@77.95,47.2 v1(78.83,47.2)
  04 BOT w0.156: U24.2@78.711,64.986 79.159,64.986 79.57,65.397 79.57,65.905 R182.2@80.493,66.827 80.999,66.321 82.363,66.321 83.51,65.174 83.51,63.166 82.392,62.048 80.007,62.048 78.601,60.642 78.601,56.268 77.927,55.594 77.927,48.102 v1(78.83,47.2)
SPI1--SPI4--MISO_3V3: P26.21 R183.1 U24.10 | length 48.1
  01 TOP w0.156: v1(53.544,65.833) 54.925,67.214 73.895,67.214 75.577,65.532 v1(76.454,65.532)
  04 BOT w0.156: P26.21@33.77,70.243 35.308,68.705 36.513,68.705 38.707,66.511 52.866,66.511 v1(53.544,65.833) ; R183.1@75.555,65.78 76.206,65.78 v1(76.454,65.532) 76.633,65.532 77.179,64.986 U24.10@77.511,64.986
SPI1--SPI4--MOSI: P2.73 R184.2 U24.3 | length 30.4
  01 TOP w0.156: P2.73@77.95,46.4 v1(79.66,46.4)
  04 BOT w0.156: U24.3@78.711,64.586 79.267,64.586 R184.2@80.493,65.811 81,65.304 82.36,65.304 83.077,64.588 83.077,63.362 82.156,62.442 79.765,62.442 78.17,60.847 78.17,56.576 77.496,55.902 77.496,47.752 78.848,46.4 v1(79.66,46.4)
SPI1--SPI4--MOSI_3V3: P26.19 R185.1 U24.9 | length 51.8
  01 TOP w0.156: v1(54.738,65.833) 55.725,66.82 73.727,66.82 75.63,64.917 v1(76.372,64.917)
  04 BOT w0.156: P26.19@31.23,70.243 32.285,71.298 34.672,71.298 35.052,70.919 35.052,69.718 35.61,69.159 36.726,69.159 38.953,66.932 53.041,66.932 53.653,66.32 54.251,66.32 v1(54.738,65.833) ; R185.1@75.555,64.917 v1(76.372,64.917) 76.703,64.586 U24.9@77.511,64.586
TYPEC0_AUX_N: C83.2 DT21.5 DT21.6 P18.B8 R105.1 R106.2 | length 15.4
  01 TOP w0.109: v1(4.538,44.055) P18.B8@5.545,44.055 ; R105.1@10.778,45.048 11.021,44.805 11.474,44.805 v1(11.623,44.954) 11.772,44.805 12.011,44.805 12.378,44.439 12.378,41.629 12.603,41.403 12.756,41.403 R106.2@13.063,41.71
  04 BOT w0.109: v1(4.538,44.055) 4.774,44.291 8.207,44.291 8.721,44.805 9.914,44.805 DT21.5@10.033,44.925 10.152,44.805 10.684,44.805 DT21.6@10.803,44.925 10.922,44.805 11.474,44.805 v1(11.623,44.954) 11.772,44.805 12.286,44.805 C83.2@12.525,45.045
TYPEC0_AUX_P: C82.2 DT21.4 DT21.7 P18.A8 R100.2 R104.1 | length 13.6
  01 TOP w0.109: P18.A8@6.845,42.305 8.118,42.305 v1(8.319,42.505) ; R104.1@10.778,44.298 11.023,44.544 11.474,44.544 v1(11.623,44.395) 11.772,44.544 11.902,44.544 12.116,44.33 12.116,41.52 12.495,41.141 12.756,41.141 R100.2@13.063,40.835
  04 BOT w0.109: v1(8.319,42.505) 8.319,44.033 8.83,44.544 9.914,44.544 DT21.4@10.033,44.425 10.152,44.544 10.684,44.544 DT21.7@10.803,44.425 10.922,44.544 11.474,44.544 v1(11.623,44.395) 11.772,44.544 12.276,44.544 C82.2@12.525,44.295
TYPEC0_CC1: C84.1 DT19.1 P18.A5 U16.10 U16.11 | length 21.2
  01 TOP w0.156: v1(3.894,44.052) 3.266,44.052 2.501,43.287 2.501,40.586 5.067,38.02 8.698,38.02 ; P18.A5@6.848,43.805 v1(7.66,43.805) ; C84.1@9.454,39.369 9.454,38.304 ; U16.11@9.494,37.2 9.047,37.2 8.698,37.549 8.698,38.02 ; U16.10@10.244,37.7 10.244,38.039 9.979,38.304 9.454,38.304 ; 8.698,38.02 9.169,38.02 9.454,38.304
  04 BOT w0.156: v1(3.894,44.052) 4.36,43.586 4.92,43.586 5.038,43.468 DT19.1@5.491,43.468 7.323,43.468 v1(7.66,43.805)
TYPEC0_CC2: C85.1 DT19.2 P18.B5 U16.1 U16.14 | length 20.5
  01 TOP w0.156: v1(2.046,42.782) 2.046,40.501 5.608,36.939 5.608,36.115 6.169,35.555 7.439,35.555 7.783,35.21 8.999,35.21 ; v1(4.65,42.575) 4.66,42.565 5.538,42.565 P18.B5@5.548,42.555 ; U16.14@9.494,35.7 9.144,35.7 8.999,35.555 8.999,35.21 ; C85.1@9.64,33.848 9.64,34.569 ; U16.1@10.244,35.2 10.244,34.818 9.995,34.569 9.64,34.569 ; 8.999,35.21 9.64,34.569
  04 BOT w0.156: v1(2.046,42.782) 2.548,42.782 3.373,41.957 4.066,41.957 4.65,42.541 v1(4.65,42.575) 4.698,42.527 4.883,42.527 4.942,42.468 DT19.2@5.491,42.468
TYPEC0_CC_INT: D8.2 R114.1 U16.5 | length 8.3
  01 TOP w0.156: U16.5@11.994,36.2 12.021,36.172 12.548,36.172 12.559,36.161 v1(12.973,36.161) ; D8.2@14.2,39.252 14.416,39.252 15.937,37.731 15.937,36.971 v1(15.473,36.507) 15.331,36.65 R114.1@14.657,36.65
  04 BOT w0.156: v1(12.973,36.161) 14.806,36.161 15.151,36.507 v1(15.473,36.507)
TYPEC0_OTG_N: DT21.1 DT21.10 P18.A7 P18.B7 R107.2 | length 12
  01 TOP w0.142: v1(4.708,43.137) 4.708,43.261 5.002,43.555 P18.B7@5.545,43.555 ; P18.A7@6.848,42.805 v1(7.719,42.805) 7.941,43.027 9.063,43.027 v1(9.195,42.895)
  04 BOT w0.142: v1(4.708,43.137) 4.953,42.891 6.293,42.891 6.379,42.805 v1(7.719,42.805) ; v1(9.195,42.895) 9.327,43.027 9.93,43.027 DT21.1@10.033,42.925 10.136,43.027 10.7,43.027 DT21.10@10.803,42.925 10.906,43.027 13.88,43.027 R107.2@14.156,42.751
TYPEC0_OTG_P: DT21.2 DT21.9 P18.A6 P18.B6 R108.2 | length 9.1
  01 TOP w0.142: P18.B6@5.548,43.055 6.103,43.055 6.353,43.305 P18.A6@6.845,43.305 7.611,43.305 7.629,43.322 9.063,43.322 v1(9.195,43.454)
  04 BOT w0.142: v1(9.195,43.454) 9.327,43.322 9.93,43.322 DT21.2@10.033,43.425 10.136,43.322 10.7,43.322 DT21.9@10.803,43.425 10.906,43.322 13.876,43.322 R108.2@14.156,43.601
TYPEC0_RX1_N: DT18.4 DT18.7 P18.B10 R109.2 | length 14.2
  01 TOP w0.142: v1(3.577,45.43) 3.771,45.43 4.133,45.068 4.487,45.068 4.576,45.157 4.891,45.157 4.993,45.055 P18.B10@5.545,45.055 ; v1(11.914,47.003) 12.101,47.003 12.881,46.223 13.311,46.223 R109.2@13.526,46.008
  04 BOT w0.142: v1(3.577,45.43) 3.627,45.38 3.817,45.38 4.129,45.068 4.487,45.068 4.619,45.2 6.359,45.2 8.637,47.477 9.93,47.477 DT18.4@10.033,47.375 10.136,47.477 10.7,47.477 DT18.7@10.803,47.375 10.906,47.477 11.627,47.477 11.914,47.19 v1(11.914,47.003)
TYPEC0_RX1_P: DT18.5 DT18.6 P18.B11 R110.2 | length 13.2
  01 TOP w0.142: v1(4.31,45.495) 4.352,45.452 4.904,45.452 5.007,45.555 P18.B11@5.545,45.555 ; v1(12.309,47.398) 12.309,47.212 13.003,46.518 13.311,46.518 R110.2@13.526,46.733
  04 BOT w0.142: v1(4.31,45.495) 4.728,45.495 4.83,45.596 5.084,45.596 5.186,45.495 5.468,45.495 5.57,45.596 5.824,45.596 5.925,45.495 6.237,45.495 6.52,45.778 6.52,46.028 6.7,46.208 6.951,46.208 7.15,46.408 7.15,46.659 7.33,46.838 7.581,46.838 7.78,47.038 7.78,47.289 7.96,47.468 8.211,47.468 8.514,47.772 8.817,47.772 9.061,48.016 9.315,48.016 9.559,47.772 9.93,47.772 DT18.5@10.033,47.875 10.136,47.772 10.7,47.772 DT18.6@10.803,47.875 10.906,47.772 11.749,47.772 12.123,47.398 v1(12.309,47.398)
TYPEC0_RX2_N: DT20.5 DT20.6 P18.A10 R111.2 | length 6.4
  01 TOP w0.142: P18.A10@6.848,41.305 7.402,41.305 7.504,41.202 8.26,41.202 8.416,41.359 v1(8.416,41.545)
  04 BOT w0.142: v1(8.416,41.545) 8.603,41.545 8.93,41.872 9.945,41.872 DT20.5@10.048,41.975 10.151,41.872 10.715,41.872 DT20.6@10.818,41.975 10.921,41.872 12.303,41.872 R111.2@12.525,42.094
TYPEC0_RX2_P: DT20.4 DT20.7 P18.A11 R112.2 | length 6.4
  01 TOP w0.142: P18.A11@6.848,40.805 7.388,40.805 7.491,40.907 8.382,40.907 8.625,41.15 v1(8.811,41.15)
  04 BOT w0.142: v1(8.811,41.15) 8.811,41.337 9.052,41.577 9.945,41.577 DT20.4@10.048,41.475 10.151,41.577 10.715,41.577 DT20.7@10.818,41.475 10.921,41.577 12.292,41.577 R112.2@12.525,41.344
TYPEC0_TX1_N: C86.2 DT18.1 DT18.10 P18.A3 | length 8.7
  01 TOP w0.142: P18.A3@6.848,44.805 7.388,44.805 7.491,44.907 7.823,44.907 8.405,45.489 v1(8.591,45.489)
  04 BOT w0.142: v1(8.591,45.489) 8.591,45.676 8.893,45.977 9.93,45.977 DT18.1@10.033,45.875 10.136,45.977 10.7,45.977 DT18.10@10.803,45.875 10.906,45.977 14.462,45.977 C86.2@14.68,45.759
TYPEC0_TX1_P: C87.2 DT18.2 DT18.9 P18.A2 | length 8.7
  01 TOP w0.142: P18.A2@6.848,45.305 7.402,45.305 7.504,45.202 7.701,45.202 8.196,45.697 v1(8.196,45.884)
  04 BOT w0.142: v1(8.196,45.884) 8.383,45.884 8.771,46.272 9.93,46.272 DT18.2@10.033,46.375 10.136,46.272 10.7,46.272 DT18.9@10.803,46.375 10.906,46.272 14.444,46.272 C87.2@14.68,46.509
TYPEC0_TX2_N: C88.2 DT20.2 DT20.9 P18.B3 | length 13.4
  01 TOP w0.142: v1(3.888,41.232) 4.075,41.232 4.295,41.452 4.904,41.452 5.007,41.555 P18.B3@5.545,41.555
  04 BOT w0.142: v1(3.888,41.232) 4.075,41.232 4.298,41.454 7.201,41.454 8.284,40.372 9.945,40.372 DT20.2@10.048,40.475 10.151,40.372 10.715,40.372 DT20.9@10.818,40.475 10.925,40.367 14.453,40.367 C88.2@14.68,40.595
TYPEC0_TX2_P: C89.2 DT20.1 DT20.10 P18.B2 | length 13.3
  01 TOP w0.142: v1(4.283,40.837) 4.283,41.023 4.417,41.157 4.891,41.157 4.993,41.055 P18.B2@5.545,41.055
  04 BOT w0.142: v1(4.283,40.837) 4.283,41.023 4.42,41.16 4.962,41.16 5.161,40.961 5.474,40.961 5.673,41.16 5.955,41.16 6.155,40.961 6.467,40.961 6.666,41.16 7.079,41.16 7.249,40.99 7.249,40.788 7.398,40.639 7.6,40.639 8.086,40.153 8.162,40.077 9.945,40.077 DT20.1@10.048,39.975 10.151,40.077 10.715,40.077 DT20.10@10.818,39.975 10.916,40.073 14.453,40.073 C89.2@14.68,39.845
UART0--UART2--RX_DEBUG: P2.9 Q5.2 R47.2 | length 85
  01 TOP w0.156: Q5.2@18.406,31.203 19.27,31.203 R47.2@19.743,30.73 20.015,31.002 20.015,37.733 v1(21.115,38.833) ; v1(48.065,57.566) 74.258,57.566 75.892,59.2 76.552,59.2 76.586,59.234 77.066,59.234 77.099,59.2 P2.9@77.95,59.2
  04 BOT w0.156: v1(21.115,38.833) 29.293,38.833 30.945,37.181 41.602,37.181 48.065,43.645 v1(48.065,57.566)
UART0--UART2--TX_DEBUG: P2.7 Q6.2 R48.2 | length 88.2
  01 TOP w0.156: Q6.2@18.415,27.658 19.298,27.658 R48.2@19.743,27.212 20.445,27.914 20.445,37.208 v1(22.55,39.313) ; v1(47.585,58.003) 74.117,58.003 75.714,59.6 P2.7@77.95,59.6
  04 BOT w0.156: v1(22.55,39.313) 29.493,39.313 31.144,37.662 41.403,37.662 47.585,43.844 v1(47.585,58.003)
UART0_RX: Q5.3 U5.26 | length 6.9
  01 TOP w0.156: U5.26@11.222,31.083 11.222,31.772 11.74,32.29 13.586,32.29 15.623,30.253 Q5.3@16.406,30.253
UART0_TX: Q6.3 U5.25 | length 9.3
  01 TOP w0.156: U5.25@11.723,31.083 11.723,31.65 12.009,31.937 13.457,31.937 15.248,30.146 15.248,27.149 15.689,26.708 Q6.3@16.415,26.708
UART4_CTSN_M1: P3.36 P9.34 | length 13.7
  01 TOP w0.156: v1(36.05,20.71) 36.76,20 P3.36@37.55,20
  04 BOT w0.156: P9.34@28.179,28.161 29.177,28.161 29.684,27.655 29.684,27.238 33.118,23.803 33.845,23.803 35.041,22.607 35.357,22.607 36.05,21.914 v1(36.05,20.71)
UART4_RTSN_M1: P3.34 P9.36 | length 12.8
  01 TOP w0.156: v1(35.355,21.452) 35.943,21.452 36.995,20.4 P3.34@37.55,20.4
  04 BOT w0.156: P9.36@28.179,27.661 29.106,27.661 29.327,27.44 29.327,26.726 34.601,21.452 v1(35.355,21.452)
UART4_RX_M1: P3.30 P9.22 | length 17.1
  01 TOP w0.156: v1(29.434,31.368) 29.434,29.88 v1(31.239,28.075) ; P3.30@37.55,21.2 38.089,21.2 38.239,21.35 v1(38.239,21.352)
  04 BOT w0.156: P9.22@28.179,31.161 29.227,31.161 v1(29.434,31.368) ; v1(31.239,28.075) 31.78,27.534 34.061,27.534 37.296,24.299 37.296,22.295 v1(38.239,21.352)
UART4_TX_M1: P3.28 P9.32 | length 13.1
  01 TOP w0.156: v1(36.661,21.6) P3.28@37.55,21.6
  04 BOT w0.156: P9.32@28.179,28.661 29.226,28.661 32.897,24.99 33.953,24.99 34.458,24.485 34.458,24.1 34.762,23.797 35.427,23.797 36.661,22.563 v1(36.661,21.6)
UART6--UART9--RX: P4.23 P26.10 | length 96.1
  01 TOP w0.156: v1(76.836,22.305) 76.931,22.4 P4.23@78.45,22.4
  04 BOT w0.156: P26.10@18.53,72.783 19.585,71.728 29.4,71.728 30.195,70.933 30.195,69.72 31.664,68.251 36.299,68.251 38.46,66.09 52.655,66.09 54.739,64.006 59.567,64.006 61.35,62.223 61.35,43.614 77.075,27.888 77.075,22.544 v1(76.836,22.305)
UART6--UART9--TX: P4.21 P26.8 | length 98.1
  01 TOP w0.156: v1(76.418,22.723) 76.496,22.8 P4.21@78.45,22.8
  04 BOT w0.156: P26.8@15.99,72.783 17.426,71.347 29.228,71.347 29.814,70.761 29.814,69.433 31.468,67.779 36.103,67.779 38.213,65.669 52.481,65.669 54.564,63.585 59.392,63.585 60.886,62.092 60.886,43.422 76.612,27.696 76.612,22.916 v1(76.418,22.723)
USB2_D2_N: DT33.1 P8.2 R146.2 | length 9.4
  04 BOT w0.142: P8.2@110.36,47.21 110.36,47.871 110.553,48.065 112.096,48.065 113.62,49.589 115.114,49.589 115.461,49.241 DT33.1@115.695,49.241 116.047,49.593 116.21,49.593 116.367,49.436 116.367,48.141 R146.2@116.088,47.861
USB2_D2_P: DT33.2 P8.3 R147.2 | length 9.9
  04 BOT w0.142: P8.3@110.36,49.21 110.36,48.563 110.564,48.359 111.974,48.359 113.498,49.883 115.118,49.883 115.475,50.241 DT33.2@115.695,50.241 116.047,49.888 116.332,49.888 116.662,49.558 116.662,48.151 R147.2@116.951,47.861
USB2_D3_N: DT29.2 P22.2 R138.2 | length 15.3
  01 TOP w0.142: R138.2@101.442,35.71 101.745,36.013 102.823,36.013 DT29.2@103.183,35.653 103.535,36.006 103.703,36.006 103.868,35.841 103.868,35.545 104.52,34.893 105.572,34.893 106.518,33.947 106.518,32.673 107.61,31.581 109.215,31.581 109.733,31.063 109.733,29.605 110.097,29.241 110.713,29.241 111.07,28.885 P22.2@111.07,28.388
USB2_D3_P: DT29.1 P22.3 R139.2 | length 15.3
  01 TOP w0.142: R139.2@101.442,36.61 101.745,36.308 102.837,36.308 DT29.1@103.183,36.653 103.535,36.3 103.825,36.3 104.162,35.963 104.162,35.668 104.642,35.188 105.694,35.188 106.813,34.069 106.813,32.795 107.732,31.875 109.337,31.875 110.028,31.185 110.028,29.727 110.219,29.536 110.713,29.536 111.07,29.892 P22.3@111.07,30.388
USB2_D4_N: DT28.2 P22.6 R143.2 | length 10.2
  01 TOP w0.142: R143.2@101.442,33.094 101.745,33.397 102.798,33.397 DT28.2@103.157,33.037 103.51,33.389 103.678,33.389 103.842,33.225 103.842,32.581 107.182,29.241 108.199,29.241 108.47,28.97 P22.6@108.47,28.388
USB2_D4_P: DT28.1 P22.7 R144.2 | length 10.2
  01 TOP w0.142: R144.2@101.442,33.994 101.745,33.691 102.812,33.691 DT28.1@103.157,34.037 103.51,33.684 103.8,33.684 104.137,33.347 104.137,32.703 107.304,29.536 108.199,29.536 108.47,29.807 P22.7@108.47,30.388
USB2_HOST1_D_N: P1.94 U20.14 | length 63.1
  01 TOP w0.142: P1.94@38.05,42.4 37.636,42.4 37.583,42.453 37.134,42.453 36.896,42.214 36.896,39.76 41.68,34.976 88.469,34.976 91.953,31.492 92.229,31.492 92.331,31.594 U20.14@92.813,31.594
USB2_HOST1_D_P: P1.92 U20.15 | length 64.1
  01 TOP w0.142: P1.92@38.05,42.8 37.636,42.8 37.583,42.747 37.012,42.747 36.601,42.336 36.601,39.638 41.558,34.681 88.347,34.681 91.831,31.197 92.229,31.197 92.331,31.095 U20.15@92.813,31.094
USB2_OTG0_D_N: P3.18 R107.1 | length 38.7
  01 TOP w0.142: v1(18.813,44.255) 18.945,44.387 25.855,44.387 38.908,31.335 38.908,24.037 38.418,23.547 38.045,23.547 37.992,23.6 P3.18@37.55,23.6
  04 BOT w0.142: R107.1@15.172,42.751 15.449,43.029 17.366,43.029 18.592,44.255 v1(18.813,44.255)
USB2_OTG0_D_P: P3.20 R108.1 | length 39.8
  01 TOP w0.142: v1(18.813,44.814) 18.945,44.682 25.977,44.682 39.202,31.457 39.202,23.915 38.54,23.253 38.045,23.253 37.992,23.2 P3.20@37.55,23.2
  04 BOT w0.142: R108.1@15.172,43.601 15.449,43.324 17.244,43.324 18.735,44.814 v1(18.813,44.814)
USB2_OTG0_VBUSDET: P3.16 R115.1 | length 29.2
  01 TOP w0.156: R115.1@21.153,24.685 21.153,25.575 21.565,25.987 21.565,31.772 v1(23.714,33.921) ; v1(26.445,32.692) 27.198,32.692 28.326,31.563 28.326,30.335 v1(30.582,28.08) ; v1(36.475,24) P3.16@37.55,24
  04 BOT w0.156: v1(23.714,33.921) 24.944,32.692 v1(26.445,32.692) ; v1(30.582,28.08) 32.453,26.209 34.12,26.209 34.463,25.866 34.463,25.422 34.894,24.99 35.485,24.99 v1(36.475,24)
USB2_OTG1_VBUSDET: P1.100 R135.1 R136.2 | length 2.8
  01 TOP w0.156: P1.100@38.05,41.2 v1(38.788,41.2)
  04 BOT w0.254: v1(38.788,41.2) 39.814,41.2 R135.1@39.822,41.208 R136.2@39.822,42.224
USB3_HOST1_SSRX_N: P2.97 R148.1 | length 33.7
  01 TOP w0.142: P2.97@77.95,41.6 77.536,41.6 77.483,41.653 76.894,41.653 76.195,40.954 76.195,39.836 76.716,39.315 87.992,39.315 98.166,49.489 101.845,49.489 R148.1@102.147,49.792
USB3_HOST1_SSRX_P: P2.95 R152.1 | length 34.7
  01 TOP w0.142: P2.95@77.95,42 77.536,42 77.483,41.947 76.772,41.947 75.9,41.076 75.9,39.714 76.594,39.021 88.114,39.021 98.288,49.195 101.845,49.195 R152.1@102.147,48.892
USB3_HOST1_SSTX_N: C132.1 P2.91 | length 37.1
  01 TOP w0.142: P2.91@77.95,42.8 77.536,42.8 77.483,42.853 76.444,42.853 75.128,41.537 75.128,39.201 76.104,38.225 88.465,38.225 97.552,47.312 101.799,47.312 C132.1@102.152,47.665
USB3_HOST1_SSTX_P: C133.1 P2.89 | length 38
  01 TOP w0.142: P2.89@77.95,43.2 77.536,43.2 77.483,43.147 76.322,43.147 74.833,41.659 74.833,39.079 75.982,37.93 88.587,37.93 97.675,47.017 101.799,47.017 C133.1@102.152,46.665
USB3_OTG0_SSRX1_N: P3.3 R109.1 | length 34.3
  01 TOP w0.142: R109.1@14.212,46.008 14.427,46.223 14.689,46.223 15.001,45.911 15.001,44.803 17.371,42.432 24.975,42.432 35.377,32.031 35.377,30.926 35.377,27.662 35.377,26.501 35.223,26.347 34.945,26.347 34.892,26.4 P3.3@34.45,26.4
USB3_OTG0_SSRX1_P: P3.5 R110.1 | length 35.3
  01 TOP w0.142: R110.1@14.212,46.733 14.427,46.518 14.811,46.518 15.296,46.033 15.296,44.925 17.493,42.727 25.097,42.727 35.672,32.153 35.672,26.379 35.345,26.053 34.945,26.053 34.892,26 P3.5@34.45,26
USB3_OTG0_SSRX2_N: P3.15 R111.1 | length 34.1
  01 TOP w0.142: v1(16.363,41.998) 16.495,41.866 24.636,41.866 33.342,33.161 33.342,24.189 33.584,23.947 33.955,23.947 34.008,24 P3.15@34.45,24
  04 BOT w0.142: R111.1@13.211,42.094 13.439,41.866 16.23,41.866 v1(16.363,41.998)
USB3_OTG0_SSRX2_P: P3.17 R112.1 | length 34.1
  01 TOP w0.142: v1(16.363,41.439) 16.495,41.571 24.514,41.571 33.047,33.039 33.047,24.067 33.462,23.653 33.955,23.653 34.008,23.6 P3.17@34.45,23.6
  04 BOT w0.142: R112.1@13.211,41.344 13.439,41.571 16.23,41.571 v1(16.363,41.439)
USB3_OTG0_SSTX1_N: C86.1 P3.11 | length 37.7
  01 TOP w0.142: v1(16.703,46.419) 16.571,46.287 16.571,45.482 18.366,43.687 25.586,43.687 36.902,32.371 36.902,26.099 35.655,24.853 34.945,24.853 34.892,24.8 P3.11@34.45,24.8
  04 BOT w0.142: C86.1@15.366,45.759 15.594,45.986 16.316,45.986 16.571,46.242 16.571,46.287 v1(16.703,46.419)
USB3_OTG0_SSTX1_P: C87.1 P3.9 | length 37.5
  01 TOP w0.142: v1(16.145,46.419) 16.277,46.287 16.277,45.36 18.244,43.393 25.464,43.393 36.558,32.299 36.379,32.119 36.379,31.865 36.607,31.637 36.607,31.354 36.379,31.126 36.379,30.872 36.607,30.643 36.607,30.361 36.379,30.132 36.379,29.878 36.607,29.65 36.607,29.367 36.379,29.139 36.379,28.885 36.607,28.656 36.607,28.373 36.379,28.145 36.379,27.891 36.602,27.668 36.602,27.374 36.415,27.188 36.415,26.934 36.607,26.742 36.607,26.221 35.533,25.147 34.945,25.147 34.892,25.2 P3.9@34.45,25.2
  04 BOT w0.142: C87.1@15.366,46.509 15.594,46.281 16.007,46.281 v1(16.145,46.419)
USB3_OTG0_SSTX2_N: C88.1 P3.23 | length 31.9
  01 TOP w0.142: v1(17.227,39.935) 17.359,40.067 24.545,40.067 32.066,32.546 32.066,23.786 33.4,22.453 33.955,22.453 34.008,22.4 P3.23@34.45,22.4
  04 BOT w0.142: C88.1@15.366,40.595 15.594,40.367 16.839,40.367 17.095,40.112 17.095,40.067 v1(17.227,39.935)
USB3_OTG0_SSTX2_P: C89.1 P3.21 | length 31.9
  01 TOP w0.142: v1(16.668,39.935) 16.8,40.067 16.8,40.112 17.05,40.362 24.667,40.362 32.361,32.668 32.361,23.908 33.522,22.747 33.955,22.747 34.008,22.8 P3.21@34.45,22.8
  04 BOT w0.142: C89.1@15.366,39.845 15.594,40.073 16.53,40.073 v1(16.668,39.935)